# Altium PCB Node_Bus.PcbDoc
Units mm, origin at the board's own origin, x right, y up, seen from the top; angles counter-clockwise.
Board outline 90 x 90 mm, 2 copper layers (Top Layer, Bottom Layer); 58 components, 55 nets, 246 pads, 301 vias.
Unrouted connection lines stored in the file: 3.
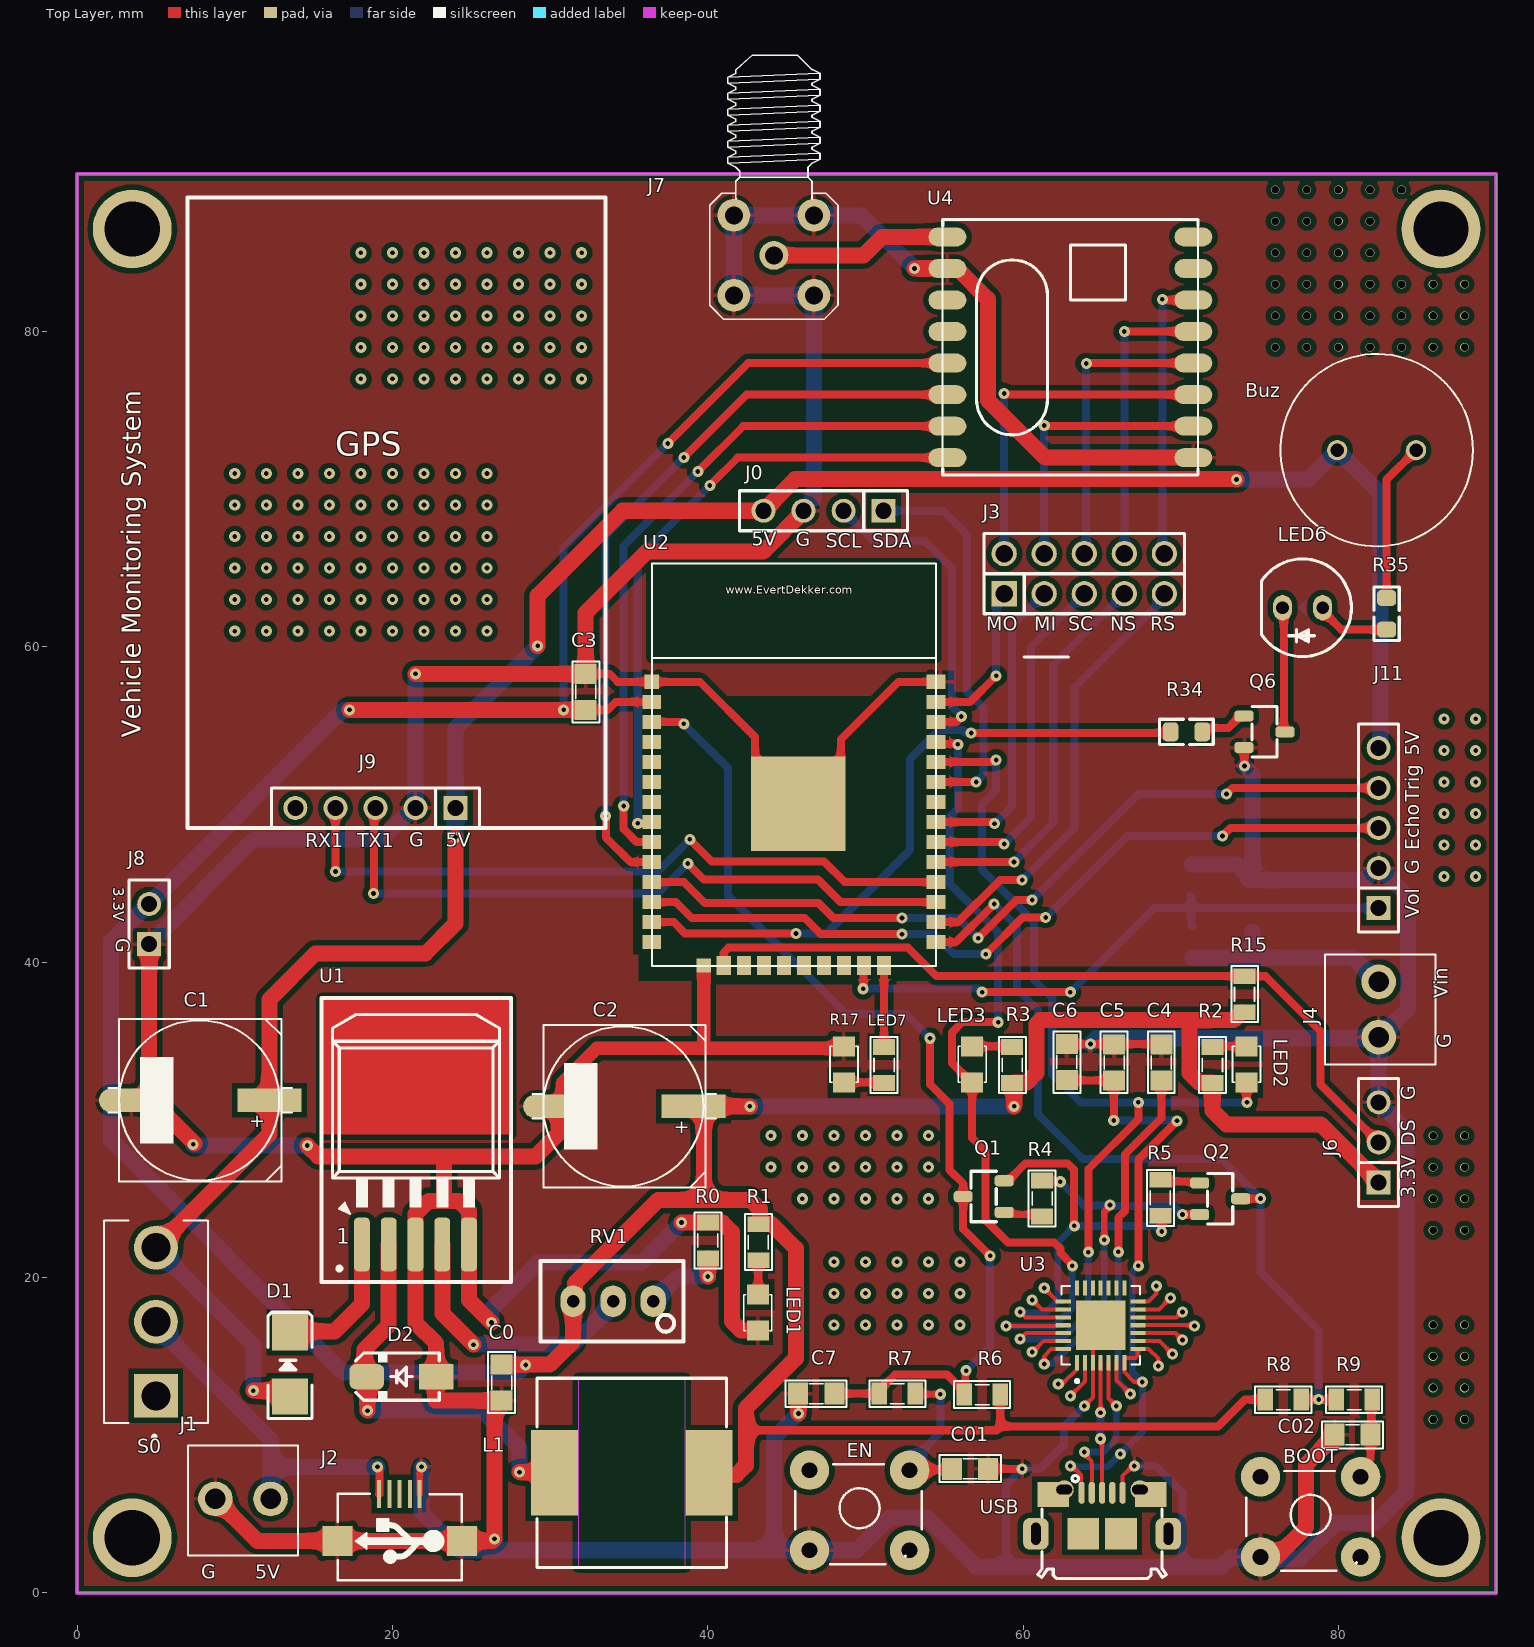
[diagram p0: Top Layer view]
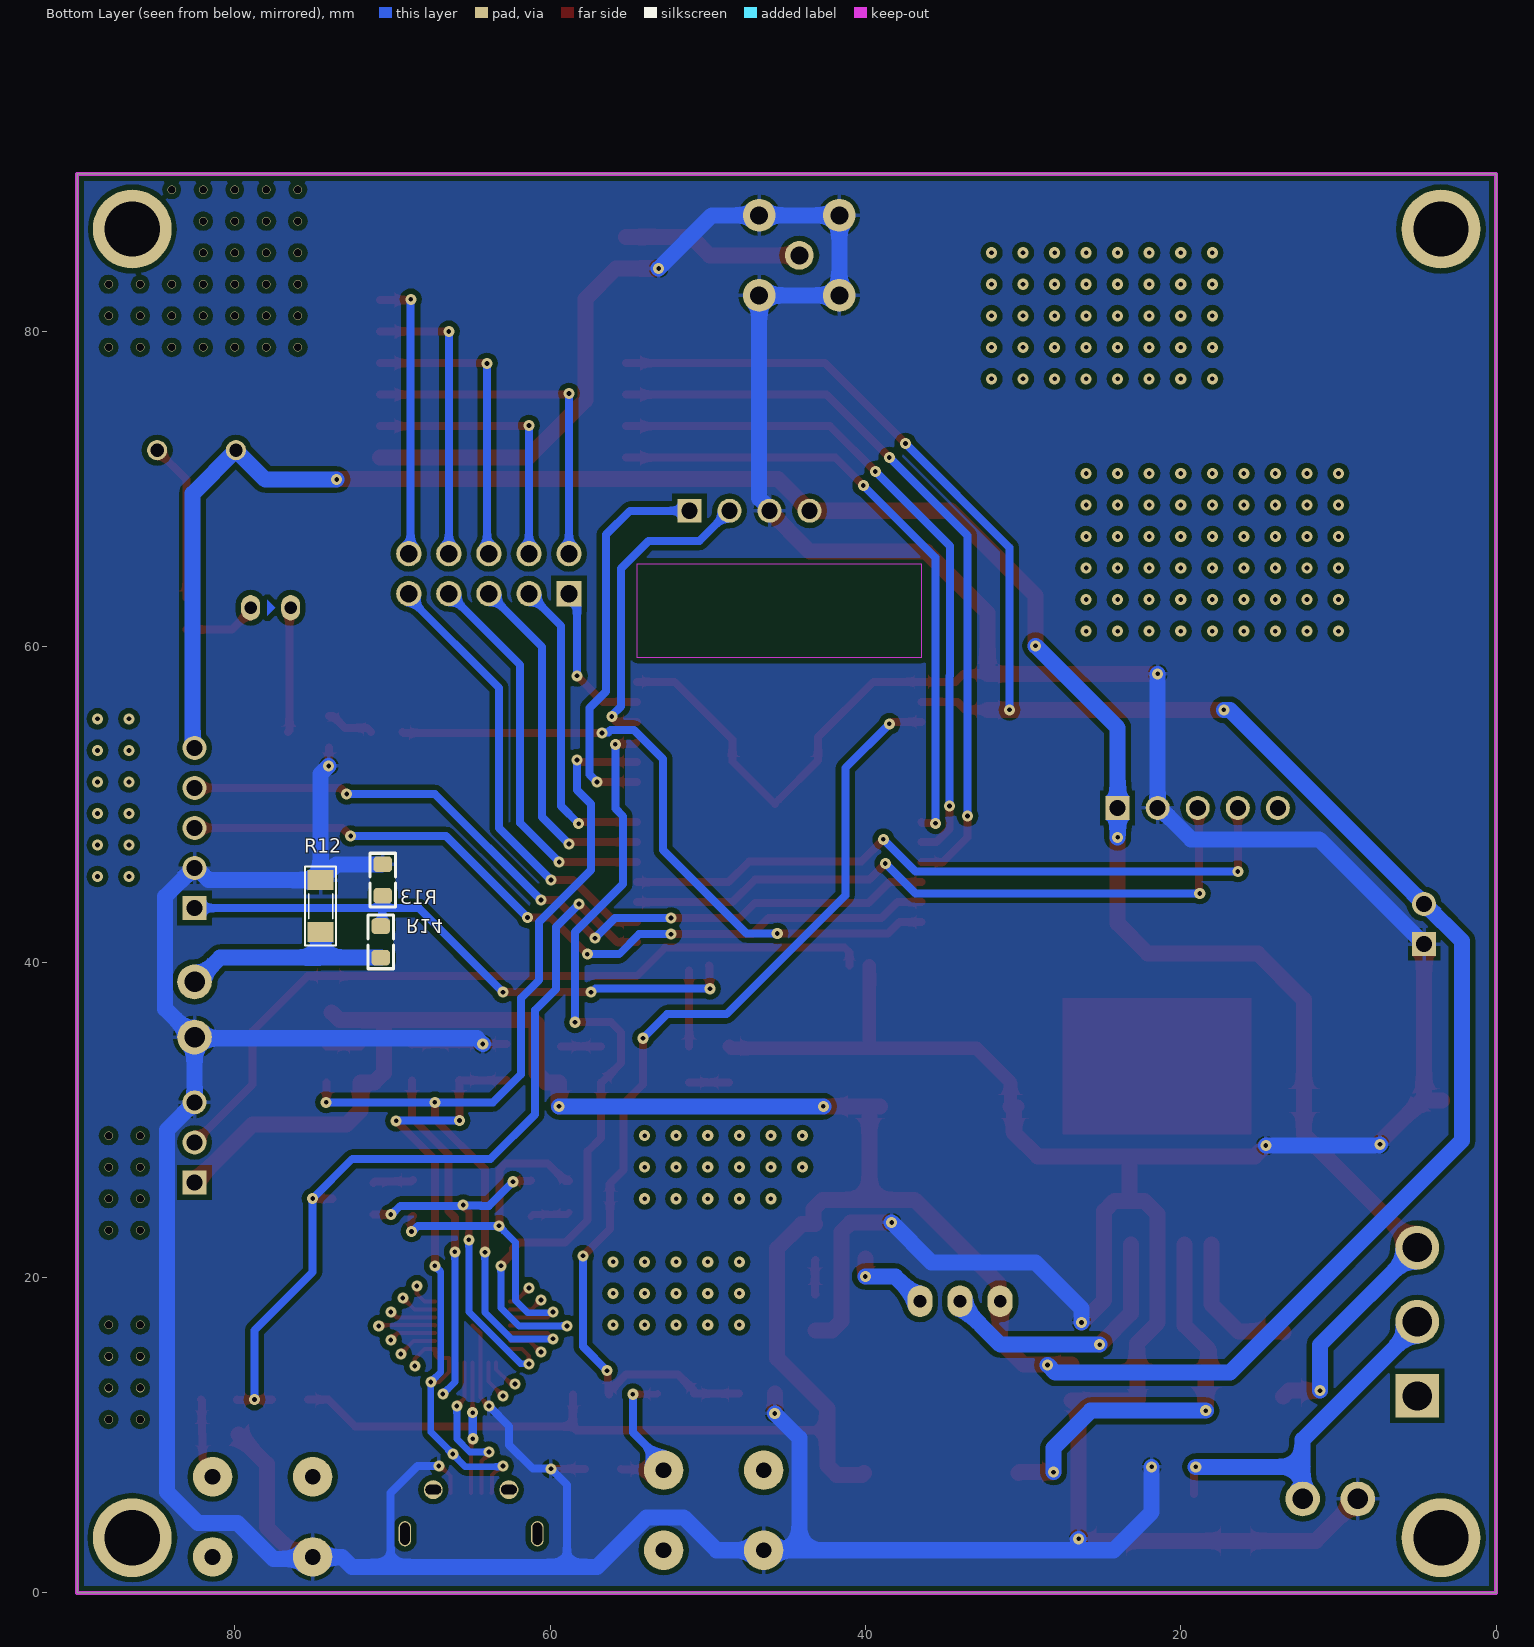
[diagram p1: Bottom Layer view, seen from below]

## Layer stack, top to bottom
Top Solder: solder mask 0.0102, Solder Resist, Dk 3.5
Top Layer: signal copper 0.0356
Dielectric 1: dielectric 0.32, FR-4, Dk 4.8
Bottom Layer: signal copper 0.0356
Bottom Solder: solder mask 0.0102, Solder Resist, Dk 3.5

## Board outline
0,0 90,0 90,90 0,90

## Design rules (kind name [scope] priority, off if disabled: settings)
Clearance [All] p1: gap=0.33 ignorepadtopadclearanceinfootprint=FALSE
HoleSize [All] p1: absolutevalues=TRUE maxlimit=3.5 minlimit=0.3 maxpercent=80.000 minpercent=20.000
PlaneClearance [All] p1: clearance=0.381
PolygonConnect [All] p1: connectstyle=Relief reliefconductorwidth=0.254 reliefentries=4 polygonreliefangle="90 Angle" airgapwidth=0.254
RoutingVias [All] p1: holewidth=0.3 width=0.7 viastyle="Through Hole" minholewidth=0.3 minwidth=0.7 maxholewidth=0.3 maxwidth=0.7
SilkToSolderMaskClearance [All] p1: minsilkscreentomaskgap=0.254 clearancetoexposedcopper=TRUE
SolderMaskExpansion [All] p1: expansion=0.102 istentingtop=FALSE
Width [InNetClass('NewClass')] p1: maxlimit=1.016 minlimit=0.432 preferedwidth=1.016
Width Width_1 [All] p2: maxlimit=1.016 minlimit=0.254 preferedwidth=0.508 minimp=50.000000 maximp=50.000000 favimp=50.000000
27 further rules are at their usual default settings.

## Components (designator, comment, footprint, x,y, rotation, side; value= is the part's Value field where it differs from the comment)
BOOT "Button 4pin" "Button 4pin" 78.105,5.08 r0 top
Buz "PS1240P02BT" XDCR_PS1240P02BT 82.423,72.477 r0 top
C0 "10uF" SM-0805 26.924,13.335 r270 top value=103
C01 "1nF" SM-0805 56.642,7.874 r180 top value=103
C1 "220uF" CAP-ALU-SMD-G 7.747,31.242 r180 top
C02 "1nF" SM-0805 80.899,10.033 r0 top value=103
C2 "220uF" CAP-ALU-SMD-G 34.645,30.861 r180 top
C3 "102" SM-0805 32.258,57.15 r90 top value=103
C4 "10uF" SM-0805 68.77,33.642 r270 top value=103
C5 "10uF" SM-0805 65.77,33.642 r270 top value=103
C6 "1uF" SM-0805 62.77,33.668 r90 top value=103
C7 "10uF" SM-0805 46.881,12.643 r0 top value=103
D1 "Diode SMD" DIO-SMD-106 13.5,14.5 r270 top value=1N5007
D2 "SS34" D_SMA 20.574,13.716 r180 top
EN "Button 4pin" "Button 4pin" 49.5,5.5 r0 top
J0 "JP4" JP4-C1T 51.159,68.635 r180 top
J1 "KF2" KF2-3.5 10.52,5.96 r0 top
J2 "USB-5" USB-M1 20.46,6.27 r180 top
J3 "JP5x2" JP5-D2T 63.881,64.643 r0 top
J4 "KF2" KF2-3.5 82.55,37.003 r90 top
J6 "JP3" JP3-C1T 82.55,26.035 r90 top
J7 "210111003" SMA-RA 44.196,84.836 r180 top
J8 "JP2" JP2-C1T 4.572,41.148 r90 top
J9 "JP5" JP5-C1T 24.003,49.784 r180 top
J11 "JP5" JP5-C1T 82.55,43.434 r90 top
L1 "33uH" L-SMD-M-12x10 35.179,7.62 r90 top
LED1 "LED" LED-0805-Red 43.18,18.923 r270 top value="LED 3 - 5 ly 2 Colour"
LED2 "LED" LED-0805-Red 74.168,34.671 r270 top value="LED 3 - 5 ly 2 Colour"
LED3 "LED" LED-0805-Red 56.77,34.671 r270 top value="LED 3 - 5 ly 2 Colour"
LED6 "LED5MM_RED" LED5MM_RED 77.724,62.484 r180 top
LED7 "LED" LED-0805-Red 48.641,32.385 r90 top value="LED 3 - 5 ly 2 Colour"
Q1 "SS8050" SOT23_3 57.5,25.141 r180 top
Q2 "SS8050" SOT23_3 72.5,25 r0 top
Q6 "SS8050" SOT23_3 75.311,54.61 r0 top
R0 "330" RES-SMD-0805 40.005,22.352 r90 top
R1 "1k" RES-SMD-0805 43.212,22.245 r90 top
R2 "Res" RES-SMD-0805 72.009,33.49 r90 top
R3 "Res" RES-SMD-0805 59.309,33.49 r90 top
R4 "10K" RES-SMD-0805 61.214,25.019 r270 top
R5 "10K" RES-SMD-0805 68.707,25.061 r90 top
R6 "10K" RES-SMD-0805 57.404,12.573 r180 top
R7 "1K" RES-SMD-0805 52.024,12.643 r0 top
R8 "10K" RES-SMD-0805 76.5,12.262 r0 top
R9 "1K" RES-SMD-0805 81,12.262 r0 top
R12 "0.1R" RES-SMD-1206 74.549,43.561 r90 bottom
R13 "100K" R0805 70.739,41.291 r270 bottom
R14 "10K" R0805 70.612,45.212 r90 bottom
R15 "4.7K" RES-SMD-0805 74.041,37.973 r90 top
R17 "1K" RES-SMD-0805 51.181,33.49 r270 top
R34 "3.9K" R0805 70.358,54.61 r180 top
R35 "10K" R0805 83.058,62.103 r270 top
RV1 "RV20K" RVAR10K 34,18.5 r180 top
S0 "500SSP1S2M2QEA" SW_500SSP1S2M2QEA 5,17.2 r90 top
U1 "LM2596" TO263 21.082,28.067 r0 top
U2 "ESP32S_Module" ESP32S 36.449,39.751 r0 top locked
U3 "CP2102" QFN50P500X500X100-29N 64.921,16.975 r90 top
U4 "SW96" RFM22_S 63,79 r180 top
USB "CONN_USB_MICROB" USB_MICRO_B_BM_SHS 65.009,6.35 r180 top

## Footprints (in the part's own frame and the unit in brackets; to place one, negate y for a bottom-side part, rotate by r counter-clockwise, add the part's x,y. Pads: shape width x height; smd on the part's side, far side on the other; paste and mask are expansions set on the pad)
"Button 4pin" [mm] "nut nhan 4pin"
  round 2.5 hole 1: 1(-3.048,2.286) 2(3.302,-2.794) 3(3.302,2.286) 4(-3.048,-2.794)
  silkscreen extent -3.95,-3.67 4.08,2.65, body extent -3.9,-3.63 4,2.57, height 7
CAP-ALU-SMD-G [mil]
  rect 160x59.06 smd: 1(-175,0)
  oval 160x59.06 smd: 2(170,0)
  silkscreen extent -231,-203 226,203, body extent -233,-203 223,203, height 402
D_SMA [mm] "SMA Molded Diode, 2-Leads, Body 4.3x2.7mm, SOD-128"
  rect 2.2x1.6 smd paste-0.1: 1(-2.2,0)
  rrect50% 2.2x1.6 smd paste-0.1: 2(2.2,0)
  silkscreen extent -2.4,-1.5 2.9,1.5, body extent -2.75,-1.4 2.75,1.4, height 2.6
DIO-SMD-106 [mil]
  rect 90x90.55 smd: 1(80,0) 2(-80,0)
  silkscreen extent -130,-55 135,55, body extent -99,-50 106,52, height 95
ESP32S [mm] "ESP32S-Module"
  rect 0.9x0.9 smd: 1(0,18.034) 15(3.3,0.034)
  rect 1.2x0.9 smd: 2(0,16.764) 3(0,15.494) 4(0,14.224) 5(0,12.954) 6(0,11.684) 7(0,10.414) 8(0,9.144) 9(0,7.874) 10(0,6.604) 11(0,5.334) 12(0,4.064) 13(0,2.794) 14(0,1.524) 25(18.034,1.524) 26(18.034,2.794) 27(18.034,4.064) 28(18.034,5.334) 29(18.034,6.604) 30(18.034,7.874) 31(18.034,9.144) 32(18.034,10.414) 33(18.034,11.684) 34(18.034,12.954) 35(18.034,14.224) 36(18.034,15.494) 37(18.034,16.764) 38(18.034,18.034)
  rect 0.9x1.2 smd: 16(4.57,0.034) 17(5.84,0.034) 18(7.11,0.034) 19(8.38,0.034) 20(9.65,0.034) 21(10.92,0.034) 22(12.19,0.034) 23(13.46,0.034) 24(14.73,0.034)
  rect 6x6 smd: 101(9.3,10.3)
  Keep-Out Layer region: 0,19.558 18.034,19.558 18.034,25.527 0,25.527
  silkscreen extent 0,0 18.03,25.53, body extent 0,0 18.03,25.53, height 2
JP2-C1T [mm] "2 row, straight, gold plating"
  rect 1.52x1.52 hole 1.02: 1(0,0)
  round 1.52 hole 1.02: 2(2.54,0)
  silkscreen extent -1.52,-1.27 4.06,1.27, body extent -1.52,-1.25 4.06,1.25, height 8.51
JP3-C1T [mm] "3 row, straight, gold plating"
  rect 1.52x1.52 hole 1.02: 1(0,0)
  round 1.52 hole 1.02: 2(2.54,0) 3(5.08,0)
  silkscreen extent -1.52,-1.27 6.6,1.27, body extent -1.52,-1.25 6.6,1.25, height 8.51
JP4-C1T [mm] "4 row, straight, gold plating"
  rect 1.52x1.52 hole 1.02: 1(0,0)
  round 1.52 hole 1.02: 2(2.54,0) 3(5.08,0) 4(7.62,0)
  silkscreen extent -1.52,-1.27 9.14,1.27, body extent -1.52,-1.25 9.14,1.25, height 8.51
JP5-C1T [mm] "5 row, straight, gold plating"
  rect 1.52x1.52 hole 1.02: 1(0,0)
  round 1.52 hole 1.02: 2(2.54,0) 3(5.08,0) 4(7.62,0) 5(10.16,0)
  silkscreen extent -1.52,-1.27 11.68,1.27, body extent -1.52,-1.25 11.68,1.25, height 8.51
JP5-D2T [mm] "10 pins, dual pin, straight, gold plating"
  rect 1.6x1.6 hole 1.1: 1(-5.08,-1.27)
  round 1.6 hole 1.1: 2(-2.54,-1.27) 3(0,-1.27) 4(2.54,-1.27) 5(5.08,-1.27) 6(5.08,1.27) 7(2.54,1.27) 8(0,1.27) 9(-2.54,1.27) 10(-5.08,1.27)
  silkscreen extent -6.35,-2.54 6.35,2.54, body extent -6.35,-2.54 6.35,2.54, height 8.55
KF2-3.5 [mm] "3,50mm - modular - blue - Horizontal wire entry - Pressure clamp - 8,4mm height - 02p"
  round 2.2 hole 1.3: 1(-1.75,0) 2(1.75,0)
  silkscreen extent -3.5,-3.6 3.5,3.4, body extent -3.95,-3.6 4.05,3.4, height 8.41
L-SMD-M-12x10 [mm] "WE-PDA SMD Shielded Power Inductor, 1210"
  rect 5.4x3 smd: 1(0,4.9) 2(0,-4.9)
  Top Layer keep-out region: -6,-3.4 6,-3.4 6,3.399 -6,3.399
  silkscreen extent -6,-6 6,6, body extent -6,-6 6,6, height 9.7
LED5MM_RED [mm] "LED THD 5MM RED"
  oval 1.2x1.6 hole 0.8: 1(-1.27,0) 2(1.27,0)
  Bottom Layer region: -0.2,0.5 -0.2,-0.5 0.3,0
  silkscreen extent -3.1,-3.1 2.6,3.1, body extent -3,-3 2.5,3, height 9.14
LED-0805-Red [mil]
  rect 50x55 smd: 1(0,0) 2(90,0)
  silkscreen extent 0,-35 90,35, body extent 5,-25 85,25, height 43
QFN50P500X500X100-29N [mm]
  rrect25% 0.97x0.26 smd: 1(-2.37,1.5) 2(-2.37,1) 3(-2.37,0.5) 4(-2.37,0) 5(-2.37,-0.5) 6(-2.37,-1) 7(-2.37,-1.5) 15(2.37,-1.5) 16(2.37,-1) 17(2.37,-0.5) 18(2.37,0) 19(2.37,0.5) 20(2.37,1) 21(2.37,1.5)
  rrect25% 0.26x0.97 smd: 8(-1.5,-2.37) 9(-1,-2.37) 10(-0.5,-2.37) 11(0,-2.37) 12(0.5,-2.37) 13(1,-2.37) 14(1.5,-2.37) 22(1.5,2.37) 23(1,2.37) 24(0.5,2.37) 25(0,2.37) 26(-0.5,2.37) 27(-1,2.37) 28(-1.5,2.37)
  rect 3.15x3.15 smd paste-3: 29(0,0)
  silkscreen extent -3.64,-2.5 2.5,2.5
R0805 [mm] "CHIP RESISTOR 1/8 WATT ,2.0X1.3mm, 0805, 2012"
  rrect50% 1x1.2 smd paste-5 mask+0.075: 1(-1,0) 2(1,0)
  Top Layer pour cut-out: -0.5,0.8 0.5,0.8 0.5,-0.8 -0.5,-0.8
  silkscreen extent -1.7,-0.8 1.7,0.8, body extent -1.15,-0.67 1.15,0.67, height 0.76
RES-SMD-0805 [mm]
  rect 1x1.397 smd: 1(-1.143,0) 2(1.143,0)
  silkscreen extent -1.78,-0.86 1.78,0.84, body extent -1,-0.62 1,0.63, height 0.8
RES-SMD-1206 [mil]
  rect 50x65 smd: 1(-65,0) 2(65,0)
  silkscreen extent -99,-38 99,39, body extent -63,-31 63,32, height 40
RFM22_S [mm] "MODULE, WIRELESS, RFM22-S1"
  oval 2.4x1.2 smd: 1(-7.8,7) 2(-7.8,5) 3(-7.8,3) 4(-7.8,1) 5(-7.8,-1) 6(-7.8,-3) 7(-7.8,-5) 8(-7.8,-7) 9(7.8,-7) 10(7.8,-5) 11(7.8,-3) 12(7.8,-1) 13(7.8,1) 14(7.8,3) 15(7.8,5) 16(7.8,7)
  silkscreen extent -8.1,-8.1 8.1,8.1, body extent -8,-8 8,7.9, height 6.18
RVAR10K [mm] "Bien tro vi chinh"
  oval 1.6x2 hole 0.8: 1(-2.54,0) 2(0,0) 3(2.54,0)
  silkscreen extent -4.47,-2.54 4.6,2.54, body extent -4.54,-2.4 4.66,2.4, height 12.02
SM-0805 [mil] "Compoment SMD 80x50mil"
  rect 50x55 smd: 1(-45,0) 2(45,0)
  silkscreen extent -77,-34 76,33, body extent -40,-27 40,23, height 24
SMA-RA [mil]
  round 72 hole 45: 1(0,0)
  round 82 hole 45: 2(-100,-100) 3(100,-100) 4(100,100) 5(-100,100)
  silkscreen extent -160,-500 160,160, body extent -137,-457 139,137, height 394
SOT23_3 [mm] "SOT-23, Micro3, MO-178, TO-236AB, MO-193C, SuperSOT3, SC-59, 1.5x3mm, Pitch 1.9mm"
  rrect50% 1.2x0.7 smd paste-0.05 mask+0.1: 1(-1.3,1) 2(-1.3,-1) 3(1.3,0)
  silkscreen extent -0.8,-1.6 0.8,1.6, body extent -1.32,-1.5 1.32,1.5, height 1.08
SW_500SSP1S2M2QEA [mm]
  rect 2.775x2.775 hole 1.85: 1(-4.7,0)
  round 2.775 hole 1.85: 2(0,0) 3(4.7,0)
  silkscreen extent -7.4,-3.3 6.43,3.3
TO263 [mm]
  rrect50% 1x3.4 smd: 1(-3.019,-5.969) 2(-1.319,-5.969) 4(2.081,-5.969) 5(3.781,-5.969)
  rrect50% 1x3.4 smd mask+0: 3(0.381,-5.969)
  Top Layer region: -5.568,1.016 6.432,1.016 6.432,9.65 -5.568,9.65
  silkscreen extent -5.57,-8.35 6.43,9.65, body extent -4.73,-6.84 5.43,7.8, height 4.57
USB-M1 [mil]
  rect 10x70 smd: 1(51.18,0) 2(25.59,0) 3(0,0) 4(-25.59,0) 5(-50,0)
  rect 74.8x74.8 smd: 5(-155.51,116.84) 5(155.51,116.84)
  silkscreen extent -155,-1 155,215, body extent -157,5 158,218, height 107
USB_MICRO_B_BM_SHS [mm] "CONN, USB Micro B - Standard (Bottom mount), Shell SMD, 473460001, ZX62-AB-5PA"
  oval 0.4x1.4 smd mask+0.05: 1(1.3,0) 2(0.65,0) 3(0,0) 4(-0.65,0) 5(-1.3,0)
  round 1.2 hole 0.6 slot 1 at 0 deg mask+0.05: SH1(-2.4,-0.2) SH2(2.4,-0.2)
  rect 2x2 smd: SH3(-1.2,2.6) SH4(1.2,2.6)
  rrect50% 1.6x2 / inner oval 0.8x1.6 / far side oval 0.8x1.6 hole 0.6 slot 1.4 at 90 deg: SH5(-4.2,2.6) SH6(4.2,2.6)
  rect 2x1.6 smd: SH7(-3.1,0.1) SH8(3.1,0.1)
  silkscreen extent -4.08,-1.1 4.08,5.43, body extent -3.99,-0.3 3.99,5.13, height 2.72
XDCR_PS1240P02BT [mm]
  round 1.28 hole 0.85: 1(-2.5,0) 2(2.5,0)
  silkscreen extent -6.1,-6.1 6.1,6.1

## Part data
Buz: "Buzzers Transducer, Externally Driven Piezo 3V 4kHz 60dB @ 3V, 10cm Through Hole PC Pins", Package="2020 TDK", Availability=Unavailable, MF=TDK, MP=PS1240P02BT, PRICE=None, SnapEDA_Link=https://www.snapeda.com/parts/PS1240P02BT/TDK/view-part/53420/?ref=snap
C0 C01 C02 C3 C4 C5 C6 C7: library part CM, "Cap SMD"
C1 C2: library part CN-ALU-SMD, "Polarized Capacitor (Axial)", LatestRevisionDate=17-Jul-2002, LatestRevisionNote="Re-released for DXP Platform.", PackageReference=POLAR0.8, Published=8-Jun-2000, Publisher="Altium Limited"
D1: "Default Diode", Code - JEDEC=DO-214-AB, Published=8-Jun-2000, Publisher="Altium Limited", Revision="July-2002: Re-released for DXP Platform."
D2: library part DIODE_SMD_SCHOTTKY_1N5822, "DIODE, SCHOTTKY, 40V, 3A", ASSEMBLY=ASSEMBLY, DESC=DESCRIPTION, MANF=DIODES, MANF_P#=1N5822, PARAM=40V, PARAM2=3A, PRICE=PRICE
J0: "WR-PHD 2.54 mm Angled Socket Header", Manufacturer="W¨¹rth Elektronik eiSos GmbH", partNo=613004143121, ComponentLink1 Description=Manufacturer, ComponentLink1URL=http://www.we-online.com, ComponentLink2 Description=Datasheet, ComponentLink2URL=http://katalog.we-online.de/em/datasheet/6130xx143121.pdf, Created by="Karrer Zheng", Created Date="29 March 2013", NoPins=04
J1 J4: Manufacturer="Würth Elektronik eiSos GmbH", partNo=691103110002, ComponentLink1 Description=Manufacturer, ComponentLink1URL=http://www.we-online.com, ComponentLink2 Description=Datasheet, ComponentLink2URL=http://katalog.we-online.de/em/datasheet/6911031100xx.pdf, Created by="Karrer Zheng", Created Date="29 October 2013", NoPins=2
J2: Manufacturer=FCI, Manufacturer Part Number=10118193-0001LF, Supplier Part Number 1=609-4616-1-ND, .Checked PCB=RF, .Checked SCH=MM, .Creator=MM, Category="Connectors, Interconnects", ComponentLink1Description=http://portal.fciconnect.com/Comergent//fci/drawing/10118193.pdf, ComponentLink1URL=http://portal.fciconnect.com/Comergent//fci/drawing/10118193.pdf, Connector Type="USB - micro B", Features="Shielded, Solder Retention", Gender=Receptacle, Ingress Protection=-, Mounting Type="Surface Mount, Right Angle, Horizontal", Number of Contacts=5, Packaging="Cut Tape (CT)", Pricing 1="1=0.46, 10=0.433, 25=0.3712, 50=0.3156, 100=0.3032, 250=0.27224, 500=0.25988 (USD)", RoHS="RoHS Compliant", Specifications="USB 2.0", Stock 1=28642, Supplier 1=Digi-Key
J3: "WR-PHD 2.54 mm Dual Socket Header", Manufacturer="W¨¹rth Elektronik eiSos GmbH", partNo=61301021821, ComponentLink1 Description=Manufacturer, ComponentLink1URL=http://www.we-online.com, ComponentLink2 Description=Datasheet, ComponentLink2URL=http://katalog.we-online.de/em/datasheet/6130xx21821.pdf, Created by="Karrer Zheng", Created Date="29 March 2013", NoPins=10
J6: "WR-PHD 2.54 mm Angled Socket Header", Manufacturer="W¨¹rth Elektronik eiSos GmbH", partNo=613003143121, ComponentLink1 Description=Manufacturer, ComponentLink1URL=http://www.we-online.com, ComponentLink2 Description=Datasheet, ComponentLink2URL=http://katalog.we-online.de/em/datasheet/6130xx143121.pdf, Created by="Karrer Zheng", Created Date="29 March 2013", NoPins=03
J7: library part "CON Ant", "CONNECTOR ANTEN", Manufacturer="Würth Elektronik eiSos GmbH", ComponentLink1Description=Manufacturer, ComponentLink1URL=http://www.we-online.de, ComponentLink2Description=Datasheet, ComponentLink2URL=http://katalog.we-online.de/kataloge/eisos/index.php?language=en&pf=Filter_gerade, Created by="Christin Zierenner", Created Date="May 2012", partNo=210111003
J8: "WR-PHD 2.54 mm Angled Socket Header", Manufacturer="W¨¹rth Elektronik eiSos GmbH", partNo=613002143121, ComponentLink1 Description=Manufacturer, ComponentLink1URL=http://www.we-online.com, ComponentLink2 Description=Datasheet, ComponentLink2URL=http://katalog.we-online.de/em/datasheet/6130xx143121.pdf, Created by="Karrer Zheng", Created Date="29 March 2013", NoPins=02
J9 J11: "WR-PHD 2.54 mm Angled Socket Header", Manufacturer="W¨¹rth Elektronik eiSos GmbH", partNo=613005143121, ComponentLink1 Description=Manufacturer, ComponentLink1URL=http://www.we-online.com, ComponentLink2 Description=Datasheet, ComponentLink2URL=http://katalog.we-online.de/em/datasheet/6130xx143121.pdf, Created by="Karrer Zheng", Created Date="29 March 2013", NoPins=05
L1: library part L-SMD-1, Inductance="1.0 μH", Manufacturer="Wurth Elektronik", partNo=78477010, ComponentLink1Description=Manufacturer, ComponentLink1URL=http://www.we-online.de, ComponentLink2Description=Datasheet, ComponentLink2URL=http://katalog.we-online.de/pbs/datasheet/78477010.pdf, Created by="Baojun Chen", Created Date=Nov.2015
LED1 LED2 LED3 LED7: library part "LED SMD"
LED6: library part LED_THD_5MM_RED, "LED, THD, 5MM, RED", ASSEMBLY=ASSEMBLY, DESC=DESCRIPTION, MANF=MANF, MANF_P#=MANF_PART#, PARAM2=2.2V, PRICE=PRICE
Q1 Q2 Q6: library part NPN_MMBT8050_SOT23, "BJT, NPN, 25v, 1.5A, SMD, SOT23", MANF=GALAXY, MANF_P#=MMBT8050, PARAM="25v, 1.5A", PARAM2=300mW, PRICE=0.09t@JAVAN
R0 R1 R2 R3 R4 R5 R6 R7 R8 R9 R15 R17: library part Res-SMD, "Resistor", Manufacturer="Generic Components", Class=Passive, Published=08/06/2000, Publisher="Altium Hobart Technology Centre"
R12 R13 R14 R34 R35: library part RES_SMD_0805, "RESISTOR, SMD", ASSEMBLY=ASSEMBLY, DESC=DESCRIPTION, DIST#=MOUSER, MANF=-, MANF_P#=-, PARAM=0.125W, PARAM2=1%, PRICE="100= 0.5$"
RV1: library part "Variable Resistor", "Variable Resistor", LatestRevisionDate=17-Jul-2002, LatestRevisionNote="Re-released for DXP Platform.", PackageReference=VR5, Published=8-Jun-2000, Publisher="Altium Limited", Set Position=0.5, Sim Note="Enter the Resistance value and the set point into parameter fields."
S0: "Slide Switch SPDT Through Hole", Package=None, Availability=Unavailable, MP=500SSP1S2M2QEA, PRICE=None
U1: Max Input Voltage="12 V", Max Output Current="3 (6.0 peak) A", Max Output Voltage=mV, Temperature Range="-40 to +125 degC", Category=IC-Power, Min Input Voltage=mV, Min Output Voltage=mV, Mounting Technology="Surface Mount", Status=Unreleased, Supply Voltage=mV
U2: "Esp-32S", Datasheet=https://espressif.com/sites/default/files/documentation/esp_wroom_32_datasheet_en.pdf
U3: "USB to USRT converter"
USB: library part CONN_USB_MICRO_B_BM_SHS, "CONN, USB, MICRO B, R/A, SMD, BOTTOM MOUNT", MANF=Molex, MANF_P#=47346-0001, MANF_P#2="HIROSE ZX62-AB-5PA", PARAM="1.8A, -20~85oC", PARAM2=30VAC, PRICE=0.75$

## Free pads (board coordinates)
  round 5 hole 3.5: 4(3.5,86.5) 4(3.5,3.5) 4(86.5,3.5) 4(86.5,86.5)

## Via types
v1: diameter 0.7, hole 0.3, Top Layer to Bottom Layer, 241 vias
v2: diameter 0.55, hole 0.48, Top Layer to Bottom Layer, 50 vias
v3: diameter 0.7, hole 0.3, Top Layer to Bottom Layer, tented top, 10 vias

## Nets (pads, with @x,y where several pads share a name; then routed paths per layer and width w, separated by ;. In a path a pad name is that pad's centre, name@x,y a point inside that pad or via, vN(x,y) a via of type N, cw(c..) or ccw(c..) an arc to the next point about the centre after c; other vN are vias at no path point)
+3.3V: C0.1 C2.1 C3.1 J6.1 J8.2 L1.2 R1.2 R2.1 R3.1 R6.1 R8.1 R15.1 RV1.3 U2.2 U4.13 | length 271.1
  Top Layer w0.508: C3.1 33.655,56.007 34.163,56.515 U2.2 ; v1(37.465,72.898) 42.567,78 U4.13 ; 42.418,10.317 58.31,10.317 58.547,10.555 ; R6.1 58.547,10.555 ; R8.1 74.069,12.262 72.362,10.555 65.229,10.555 65.221,10.562 64.573,10.562 64.565,10.555 58.547,10.555
  Top Layer w1.016: v1(17.272,56.007) v1(30.861,56.007) C3.1 ; C0.1 v1@28.469,14.478 ; v1(28.448,14.457) v1@28.469,14.478 ; C2.1 v1(42.672,30.861) ; C2.1@39.636,30.861 39.751,30.746 39.751,24.935 ; L1.2 40.206,7.493 41.823,7.493 42.418,8.088 42.418,10.317 42.418,11.702 45.593,14.877 45.593,21.844 44.049,23.388 R1.2@43.299,23.388 ; R1.2 R1.2@43.299,23.388 ; v1(59.436,30.861) 59.436,32.377 59.444,32.385 60.25,32.385 60.846,32.98 60.846,36.081 61.087,36.322 70.739,36.322 ; R15.1@73.851,36.822 73.351,36.322 70.739,36.322 ; J6.1 78.867,29.718 72.898,29.718 72.009,30.607 72.009,32.385 71.144,32.385 70.549,32.98 70.549,36.132 70.739,36.322 ; v1@28.469,14.478 29.972,14.478 31.46,15.966 RV1.3 31.572,18.612 31.572,19.634 36.873,24.935 39.751,24.935 ; 39.751,24.935 42.712,24.935 43.307,24.34 43.307,23.396 R1.2@43.299,23.388
  Bottom Layer w0.508: v1(30.861,56.007) 30.861,66.294 v1(37.465,72.898)
  Bottom Layer w1.016: v1(17.272,56.007) 16.891,56.007 J8.2 4.514,43.688 2.159,41.333 2.159,28.702 16.891,13.97 27.961,13.97 v1(28.448,14.457) ; v1(42.672,30.861) v1(59.436,30.861)
+5V: Buz.1 C1.1 D1.1 J0.4 J9.1 J11.5 S0.3 | length 144
  Top Layer w1.016: S0.3 12.192,29.092 C1.1 12.192,37.634 15.113,40.555 22.098,40.555 24.003,42.46 v1(24.003,47.921) ; v1(11.176,12.827) 13.141,12.827 D1.1 ; v1(29.21,60.071) 29.21,63.246 34.599,68.635 J0.4 ; J0.4@43.704,68.8 45.542,70.638 73.507,70.638 v1(73.533,70.612)
  Bottom Layer w1.016: S0.3 11.176,15.724 v1(11.176,12.827) ; v1(24.003,47.921) J9.1 24.003,54.864 v1(29.21,60.071) ; v1(73.533,70.612) 78.058,70.612 Buz.1 82.677,69.723 82.677,54.077 82.646,54.047 82.646,53.69 J11.5
alarm: R34.2 U2.13 | length 42
  Top Layer w0.508: U2.13 37.846,42.545 38.566,41.825 v3(45.593,41.825) ; v1(56.71,54.546) 56.718,54.555 69.303,54.555 R34.2
  Bottom Layer w0.508: v3(45.593,41.825) 47.54,41.825 52.832,47.117 52.832,52.895 54.675,54.738 55.344,54.738 55.349,54.733 56.16,54.733 56.31,54.583 56.673,54.583 v1(56.71,54.546)
BOOT: Q2.3 R8.2 R9.1 U2.25 | length 54.4
  Top Layer w0.508: U2.25 55.753,41.275 v1(58.166,43.688) ; Q2.3 75.027,25 75.046,25.019 v1(75.057,25.019) ; v1(78.75,12.262) R8.2 77.654,12.251 78.742,12.251 78.75,12.243 78.758,12.251 79.846,12.251 R9.1
  Bottom Layer w0.508: v1(58.166,43.688) 59.627,42.228 59.627,38.291 60.96,36.957 60.96,30.353 63.782,27.531 72.545,27.531 v1(75.057,25.019) 75.057,20.35 78.75,16.657 v1(78.75,12.262)
D+: U3.4 USB.3 | length 8.3
  Top Layer w0.254: v1(64.897,9.779) 64.897,9.699 65.009,9.587 USB.3 ; v1@64.918,11.438 64.918,14.602 U3.4
  Bottom Layer w0.508: v1(64.897,9.779) 64.905,9.787 64.905,11.425 v1(64.913,11.433)
D-: U3.5 USB.2 | length 10.2
  Top Layer w0.254: v1(63.881,8.932) 63.881,8.816 64.34,8.357 64.34,8.177 64.359,8.158 USB.2 ; 65.421,12.34 U3.5 ; 65.426,12.34 v1(65.913,11.853)
  Bottom Layer w0.432: v1(63.881,8.932) 63.889,8.94 65.095,8.94 65.913,9.758 v1(65.913,11.853)
DIO0: U2.10 U4.14 | length 48.1
  Top Layer w0.508: v1(33.528,49.276) 33.536,49.268 33.536,47.913 35.094,46.355 U2.10 ; v1(38.481,72.009) 42.472,76 U4.14
  Bottom Layer w0.508: v1(33.528,49.276) 33.528,67.056 v1(38.481,72.009)
DIO1: U2.9 U4.15 | length 43.8
  Top Layer w0.508: v1(34.671,49.911) 34.671,48.444 35.49,47.625 U2.9 ; v1(39.37,71.12) 42.25,74 U4.15
  Bottom Layer w0.508: v1(34.671,49.911) 34.671,58.142 34.641,58.172 34.641,66.391 v1(39.37,71.12)
DIO2: U2.8 U4.16 | length 40
  Top Layer w0.508: v1(35.56,48.81) 35.597,48.847 36.401,48.847 U2.8 ; v1(40.132,70.231) 41.901,72 U4.16
  Bottom Layer w0.508: v1(35.56,48.81) 35.56,65.659 v1(40.132,70.231)
ds12b8: J6.2 R15.2 U2.16 | length 49.6
  Top Layer w0.508: U2.16 41.019,40.627 41.317,40.925 52.7,40.925 54.509,39.116 R15.2 75.383,39.116 78.869,35.629 78.869,32.256 J6.2
DTR: Q2.2 R4.1 U3.28 | length 24.9
  Top Layer w0.254: v1(61.341,14.52) 61.35,14.529 61.35,15.037 61.785,15.472 62.548,15.472 U3.28
  Top Layer w0.432: v1(65.151,22.394) 65.151,24.176 65.509,24.534 v1(65.509,24.607)
  Top Layer w0.508: R4.1 61.262,26.114 62.32,26.114 v1(62.357,26.077) ; v1(70.104,24.003) 70.105,24.002 Q2.2 Q2.2
  Bottom Layer w0.432: v1(61.341,14.52) 61.361,14.54 61.869,14.54 65.151,17.822 v1(65.151,22.394) v1@65.1,22.445
  Bottom Layer w0.508: v1(62.357,26.077) 63.881,24.553 64.389,24.553 64.406,24.57 65.473,24.57 v1(65.509,24.607) ; v1@65.563,24.553 69.502,24.553 70.052,24.003 v1(70.104,24.003)
Echo: J11.3 U2.12 | length 50.8
  Top Layer w0.508: U2.12 37.973,43.815 38.989,42.799 46.147,42.799 47.163,41.783 v3(52.324,41.783) ; v1@57.629,40.505 v1(57.637,40.513) 59.96,42.836 v1(61.433,42.836) ; v1(72.644,48.006) 72.655,48.006 73.163,48.514 J11.3
  Bottom Layer w0.508: v3(52.324,41.783) 54.345,41.783 55.615,40.513 v1(57.637,40.513) ; v1(61.433,42.836) 66.603,48.006 v1(72.644,48.006)
EN: C7.2 Q1.3 R6.2 R7.1 U2.3 | length 65.1
  Top Layer w0.432: R6.2 56.337,12.649 56.337,14.046 v1(56.388,14.097)
  Top Layer w0.508: U2.3 38.302,55.245 38.429,55.118 v1(38.481,55.118) ; C7.2 R7.1 50.881,12.842 51.889,13.85 55.183,13.85 56.261,12.772 R6.2 ; v1(54.102,35.179) 54.102,32.258 55.342,31.018 55.342,26.827 56.2,25.969 56.2,23.09 v1(57.912,21.378)
  Bottom Layer w0.508: v1(38.481,55.118) 41.275,52.324 41.275,44.238 48.81,36.703 52.578,36.703 v1(54.102,35.179) ; v1(56.388,14.097) 57.912,15.621 v1(57.912,21.378)
GND: BOOT.4 C0.2 C01.1 C1.2 C02.1 C2.2 C3.2 C4.1 C5.1 C6.2 C7.1 D2.1 EN.4 J0.3 J1.1 J2.5 J4.1 J6.3 J7.2 J7.3 J7.4 J7.5 J8.1 J9.2 J11.2 LED1.2 LED7.2 Q6.2 R0.2 R12.2 R14.2 U1.3 U1.5 U2.1 U2.15 U2.38 U2.101 U3.3 U3.29 U4.1 U4.10 USB.5 | length 526.3
  Top Layer w0.254: v1(63.881,11.853) 64.421,12.393 U3.3 64.421,16.475 U3.29 ; USB.5 66.309,7.431 66.489,7.611 66.503,7.611 66.935,8.043 v1(67.056,8.043)
  Top Layer w0.432: J2.5@21.73,6.27 21.73,7.855 21.844,7.969 v1(21.844,8.001)
  Top Layer w0.508: C3.2 33.782,58.293 34.29,57.785 U2.1 39.495,57.785 43.003,54.277 43.003,52.797 U2.101@45.466,50.334 ; 40.255,34.671 LED7.2 ; U2.101 48.441,52.743 48.441,54.121 52.105,57.785 U2.38 ; C01.1 v1(59.944,7.874) ; C6.2 v1(64.27,34.811) C5.1@65.745,34.811 ; C5.1 C5.1@65.745,34.811 ; C4.1 68.745,34.811 C5.1@65.745,34.811 ; Q6.2 74.033,53.588 74.033,52.459 v1(74.041,52.451)
  Top Layer w0.85: C2.2 30.496,30.861 30.796,31.161 30.796,32.388 32.952,34.544 39.624,34.544 ; U2.15 39.749,34.669 39.624,34.544 ; LED7.2 48.514,34.544 39.624,34.544
  Top Layer w1.016: C1.2 C1.2@4.348,31.242 ; J8.1 4.572,31.466 C1.2@4.348,31.242 ; v1@7.435,28.517 4.711,31.242 C1.2@4.348,31.242 ; J1.1 11.428,3.302 24.41,3.302 26.35,3.302 v1(26.477,3.429) 26.477,11.809 26.733,12.065 C0.2@26.733,12.192 ; v1(14.605,28.375) 15.294,27.686 23.241,27.686 ; v1(21.463,58.293) C3.2 32.258,62.165 36.133,66.04 43.519,66.04 J0.3@46.228,68.749 ; v1(26.289,17.145) 24.863,18.571 U1.5 24.863,24.218 24.214,24.867 23.262,24.867 ; C0.2 22.733,12.192 22.733,13.675 D2.1 22.774,15.834 21.463,17.145 U1.3 21.463,24.021 22.309,24.867 23.262,24.867 ; C2.2@30.803,30.861 30.579,30.637 30.579,29.182 29.083,27.686 23.241,27.686 ; v1(38.337,23.495) R0.2 40.013,23.487 40.934,23.487 41.529,22.892 41.529,17.232 42.124,16.637 LED1.2 ; C7.1 45.75,12.631 v1(45.75,11.38) ; v1(53.114,84) U4.10 55.827,84 57.764,82.063 57.764,75.643 61.407,72 U4.1 ; BOOT.4 75.184,2.159 75.946,2.159 77.958,4.171 77.958,8.172 79.629,9.842 79.629,9.906 C02.1 ; 23.241,27.686 23.262,27.665 23.262,24.867
  Bottom Layer w0.508: 58.928,1.651 58.928,6.858 59.952,7.882 61.095,7.882 62.597,9.384 62.597,10.569 v1(63.881,11.853) ; v1(67.056,8.043) 68.411,8.043 70.117,6.337 70.117,1.651
  Bottom Layer w1.016: J8.1 11.218,47.794 19.337,47.794 21.327,49.784 J9.2 v1(21.463,58.293) ; v1(7.366,28.448) 7.439,28.375 v1(14.605,28.375) ; v1(21.844,8.001) 21.844,5.122 24.26,2.706 26.455,2.706 ; v1(26.289,17.145) 26.289,18.034 29.21,20.955 35.797,20.955 v1(38.337,23.495) ; v1(26.477,3.429) 26.543,3.363 26.543,2.794 ; 26.631,2.706 44.196,2.706 ; v1(45.75,11.38) 44.196,9.826 44.196,2.706 ; J0.3 46.079,68.771 46.736,69.428 J7.5 J7.4 J7.3 J7.2 49.738,87.376 v1(53.114,84) ; v1(64.27,34.811) 64.638,35.179 82.476,35.179 J4.1 ; R14.2@70.704,46.204 73.557,46.204 74.232,45.529 74.232,45.339 74.359,45.212 R12.2 ; v1(74.041,52.451) 74.549,51.943 R12.2@74.549,45.466 ; R12.2@74.867,45.212 81.651,45.212 82.414,45.974 82.608,45.974 84.412,44.17 84.412,37.041 82.624,35.253 J4.1 ; 44.196,2.706 EN.4 49.442,2.706 51.53,4.794 53.88,4.794 57.023,1.651 58.928,1.651 70.117,1.651 72.577,1.651 73.189,2.263 75.034,2.263 BOOT.4 75.184,2.159 77.555,2.159 79.82,4.424 82.327,4.424 84.308,6.406 84.308,29.357 J6.3 J4.1
led: R17.1 U2.24 | length 4.8
  Top Layer w0.508: U2.24@51.179,39.47 51.179,34.673 R17.1@51.181,34.671
MI: J3.2 U2.31 | length 19.6
  Top Layer w0.508: U2.31 58.07,48.895 58.176,48.789 v1(58.187,48.789)
  Bottom Layer w0.508: v1(58.187,48.789) 59.309,49.911 59.309,61.341 J3.2
MISO: J3.9 U4.2 | length 17.6
  Top Layer w0.508: v3(61.341,74.041) 61.352,74.041 61.393,74 U4.2
  Bottom Layer w0.508: J3.9 v3(61.341,74.041)
Mo: J3.1 U2.37 | length 10.1
  Top Layer w0.508: U2.37 56.642,56.515 v1(58.293,58.166) ; J3.1 J3.1@58.928,63.246
  Bottom Layer w0.508: v1(58.293,58.166) 58.293,62.865 J3.1
MOSI: J3.10 U4.3 | length 22.2
  Top Layer w0.508: v3(58.801,76.073) 58.812,76.073 58.885,76 U4.3
  Bottom Layer w0.508: J3.10 v3(58.801,76.073)
NetBOOT_3: BOOT.3 C02.2 R9.2 | length 5.2
  Top Layer w0.508: BOOT.3 81.407,7.905 82.042,8.54 C02.2 82.092,10.083 82.092,12.212 R9.2
NetBuz_2: Buz.2 R35.1 | length 10.1
  Top Layer w0.508: R35.1 83.058,70.612 Buz.2
NetC01_2: C01.2 EN.3 R7.2 | length 10
  Top Layer w0.432: R7.2 53.21,12.6 v1(54.75,12.6)
  Top Layer w0.508: EN.3 52.846,7.83 55.455,7.83 C01.2
  Bottom Layer w0.508: EN.3 52.802,8.236 54.75,10.184 v1(54.75,12.6)
NetC4_2: C4.2 U3.6 | length 23.7
  Top Layer w0.254: U3.6@65.929,14.605 65.929,13.488 v1(66.802,12.615)
  Top Layer w0.508: v1(66.04,21.632) 66.04,23.817 66.456,24.232 66.456,27.821 68.77,30.135 C4.2
  Bottom Layer w0.432: v1(66.04,21.632) 66.04,13.377 v1(66.802,12.615)
NetD1_2: D1.2 U1.1 | length 9.1
  Top Layer w1.016: D1.2 13.563,16.595 16.341,16.595 18.063,18.317 U1.1
NetD2_2: D2.2 L1.1 U1.2 | length 25.6
  Top Layer w1.016: v1(18.415,11.557) 18.415,13.675 18.239,13.851 18.239,15.445 19.763,16.969 U1.2 ; v1(28.067,7.662) 30.237,7.662 L1.1
  Bottom Layer w1.016: v1(18.415,11.557) 25.713,11.557 28.067,9.203 v1(28.067,7.662)
NetJ1_2: J1.2 J2.1 S0.2 | length 22.8
  Top Layer w0.508: v1(19.05,8.001) 19.05,7.99 19.169,7.871 19.169,6.279 J2.1
  Bottom Layer w1.016: S0.2 5,16.99 12.27,9.72 12.27,8.001 ; J1.2 12.27,8.001 ; v1(19.05,8.001) 12.27,8.001
NetJ4_2: J4.2 R12.1 R13.2 | length 14.1
  Bottom Layer w1.016: R13.2 72.74,40.291 74.549,40.291 ; R12.1 74.549,40.291 ; J4.2 82.476,38.753 80.935,40.295 80.931,40.291 74.549,40.291
NetJ7_1: J7.1 U4.9 | length 11.5
  Top Layer w1.016: J7.1 49.89,84.836 51.054,86 U4.9
NetLED1_1: LED1.1 R1.1 | length 2.2
  Top Layer w0.508: LED1.1 43.196,18.939 43.196,21.086 R1.1@43.18,21.102
NetLED2_1: LED2.1 R2.2 | length 2.2
  Top Layer w0.508: R2.2@72.009,34.671 LED2.1
NetLED3_1: LED3.1 R3.2 | length 2.5
  Top Layer w0.508: LED3.1 R3.2@59.309,34.671
NetLED6_1: LED6.1 R35.2 | length 4.8
  Top Layer w0.508: LED6.1 78.994,62.284 80.175,61.103 R35.2
NetLED6_2: LED6.2 Q6.3 | length 7.9
  Top Layer w0.508: LED6.2 76.532,62.406 76.532,54.689 Q6.3
NetLED7_1: LED7.1 R17.2 | length 2.5
  Top Layer w0.508: LED7.1 R17.2@51.181,32.385
NetQ1_1: Q1.1 R4.2 | length 2.5
  Top Layer w0.432: Q1.1 58.933,24.009 61.081,24.009 R4.2
NetQ2_1: Q2.1 R5.2 | length 2.6
  Top Layer w0.508: R5.2 68.815,26.096 71.104,26.096 Q2.1
NetQ6_1: Q6.1 R34.1 | length 3.1
  Top Layer w0.508: R34.1 71.358,54.618 71.604,54.864 73.015,54.864 73.761,55.61 Q6.1
NetR0_1: R0.1 RV1.1 | length 5.3
  Top Layer w1.016: v1(40.005,20.066) R0.1
  Bottom Layer w1.016: RV1.1 36.54,18.542 36.81,18.812 36.852,18.812 38.106,20.066 v1(40.005,20.066)
NetRV1_2: RV1.2 U1.4 | length 17.3
  Top Layer w1.016: U1.4 23.163,17.731 v1(25.146,15.748)
  Bottom Layer w1.016: v1(25.146,15.748) 28.194,15.748 31.448,15.748 34,18.3 RV1.2
NS: J3.4 U2.29 | length 24.9
  Top Layer w0.508: U2.29 v1(59.425,46.355)
  Bottom Layer w0.508: v1(59.425,46.355) 61.912,48.843 61.912,58.865 J3.4
NSS: J3.7 U4.5 | length 18.5
  Top Layer w0.508: v3(66.421,80.01) 66.426,80.005 70.795,80.005 U4.5
  Bottom Layer w0.508: J3.7 v3(66.421,80.01)
RESET: J3.6 U4.6 | length 18.2
  Top Layer w0.508: v3(68.834,82.042) 68.845,82.042 68.887,82 U4.6
  Bottom Layer w0.508: v3(68.834,82.042) 68.842,82.034 68.842,66.032 J3.6
RS: J3.5 U2.26 | length 28.5
  Top Layer w0.508: U2.26 55.88,42.545 58.547,45.212 v1(59.944,45.212)
  Bottom Layer w0.508: v1(59.944,45.212) 63.246,48.514 63.246,57.404 68.961,63.119 J3.5
RTS: Q1.2 R5.1 U3.24 | length 26.1
  Top Layer w0.254: v1(59.817,17.822) 60.164,17.475 U3.24
  Top Layer w0.508: Q1.2 59.05,26.142 60.155,27.246 62.821,27.246 63.215,26.852 63.215,23.314 v1(63.246,23.283) ; R5.1 68.779,23.846 68.779,22.929 v1(68.787,22.921)
  Bottom Layer w0.432: v1(59.817,17.822) 59.868,17.771 60.233,17.771 60.239,17.764 61.41,17.764 62.199,18.553 62.199,22.236 v1(63.246,23.283)
  Bottom Layer w0.508: v1(63.246,23.283) 68.373,23.283 68.735,22.921 v1(68.787,22.921)
RX1: J9.4 U2.28 | length 44.1
  Top Layer w0.508: v1(16.383,45.762) J9.4 ; v3(38.862,47.794) 40.259,46.397 47.371,46.397 48.683,45.085 U2.28
  Bottom Layer w0.508: v1(16.383,45.762) 36.83,45.762 v3(38.862,47.794)
RXD: LED3.2 U2.35 U3.25 | length 54.3
  Top Layer w0.254: v1@58.931,16.936 62.096,16.936 62.132,16.972 62.548,16.972 U3.25
  Top Layer w0.508: U2.35@54.541,53.917 54.601,53.857 55.823,53.857 v1(55.86,53.82) ; LED3.2 56.77,28.861 57.616,28.015 57.616,23.652 59.043,22.225 61.976,22.225 62.364,21.837 62.364,21.55 v1@63.119,20.795 ; LED3.2 56.707,32.386 55.488,33.605 55.488,35.549 56.134,36.195 v1(58.42,36.195)
  Bottom Layer w0.432: v1(58.928,16.933) 61.976,16.933 63.119,18.076 v1(63.119,20.743)
  Bottom Layer w0.508: v1(55.86,53.82) 55.86,49.747 55.372,49.259 55.372,44.958 58.42,41.91 v1(58.42,36.195)
SC: J3.3 U2.30 | length 22.3
  Top Layer w0.508: U2.30 58.663,47.625 58.79,47.498 v1(58.801,47.498)
  Bottom Layer w0.508: v1(58.801,47.498) 60.515,49.212 60.515,60.008 J3.3
SCK: J3.8 U4.4 | length 18.9
  Top Layer w0.508: v3(64.008,77.978) 64.019,77.978 64.041,78 U4.4
  Bottom Layer w0.508: J3.8 64,66.032 64,77.97 v3(64.008,77.978)
SDA: J0.1 U2.33 | length 24.8
  Top Layer w0.508: U2.33 v1(57.023,51.435)
  Bottom Layer w0.508: J0.1 54.936,68.635 56.451,67.12 56.451,57.175 57.493,56.134 57.493,51.905 v1(57.023,51.435)
SDL: J0.2 U2.36 | length 20.5
  Top Layer w0.508: U2.36 55.786,55.245 56.084,55.542 v1(56.084,55.591)
  Bottom Layer w0.508: J0.2 50.537,66.717 53.762,66.717 55.499,64.98 55.499,56.228 56.084,55.643 v1(56.084,55.591) ; 57.023,51.435 57.023,51.446 57.493,51.916
Trig: J11.4 U2.11 | length 51.5
  Top Layer w0.508: U2.11 38.481,45.085 39.81,43.756 47.016,43.756 47.973,42.799 v3(52.324,42.799) ; v1(57.15,41.529) 59.555,43.934 60.571,43.934 v1(60.579,43.942) ; v1(72.898,50.673) 72.909,50.673 73.29,51.054 J11.4
  Bottom Layer w0.508: v3(52.324,42.799) 55.88,42.799 v1(57.15,41.529) ; v1(60.579,43.942) 67.31,50.673 v1(72.898,50.673)
TX1: J9.3 U2.27 | length 43
  Top Layer w0.508: v1(18.796,44.365) 18.833,44.402 18.833,49.694 J9.3 ; v3(38.735,46.27) 39.751,45.254 46.99,45.254 48.429,43.815 U2.27
  Bottom Layer w0.508: v1(18.796,44.365) 36.83,44.365 v3(38.735,46.27)
TXD: LED2.2 U2.34 U3.26 | length 63.1
  Top Layer w0.254: v1@59.938,16.113 v1(59.817,16.113) 60.179,16.475 U3.26
  Top Layer w0.508: U2.34 58.155,52.705 58.282,52.832 v1(58.293,52.832) ; v1(64.135,21.609) 64.135,26.872 67.31,30.047 v1(67.31,31.115) ; LED2.2 74.168,31.159 74.201,31.126 v1(74.201,31.114)
  Bottom Layer w0.432: v1(59.817,16.113) 59.828,16.102 62.461,16.102 64.135,17.776 v1(64.135,21.609)
  Bottom Layer w0.508: v1(58.293,52.832) 58.293,50.927 57.404,50.038 57.404,45.847 60.706,42.545 60.706,38.862 61.849,37.719 61.849,32.893 63.627,31.115 v1(67.31,31.115) v1(74.201,31.114)
VBUS: C5.2 C6.1 U3.7 U3.8 USB.1 | length 44
  Top Layer w0.254: v1(62.992,8.043) 63.113,8.043 63.495,7.661 63.501,7.661 63.681,7.481 63.681,6.378 USB.1 ; v1(67.564,13.377) 67.555,13.386 67.047,13.386 66.424,14.009 66.424,14.602 U3.7 66.421,14.898 66.424,14.901 67.119,14.901 67.268,15.05 67.268,15.472 67.271,15.475 U3.8 67.964,15.475 68.58,14.859 v1(68.58,14.393)
  Top Layer w0.432: C5.2@65.745,32.525 C5.2
  Top Layer w0.508: C6.1 62.783,32.513 65.732,32.513 C5.2@65.745,32.525 ; v1(65.75,29.96) 65.76,29.97 65.76,32.49 C5.2 ; v1@67.294,20.759 67.31,20.776 67.31,27.49 v1(69.76,29.94)
  Bottom Layer w0.432: v1(62.992,8.043) 63.034,8.001 65.363,8.001 67.564,10.202 v1(67.564,13.377) 66.929,14.012 66.929,20.356 67.31,20.737 v1(67.31,20.743)
  Bottom Layer w0.508: v1(65.75,29.96) 65.76,29.95 69.75,29.95 v1(69.76,29.94)
  other v1: 66.167,8.805
voltage: J11.1 R13.1 R14.1 U2.23 | length 38.3
  Top Layer w0.508: v1(49.86,38.32) 49.885,38.345 49.885,39.76 U2.23 ; v1(57.404,38.1) v1(62.992,38.1)
  Bottom Layer w0.508: v1(49.86,38.32) 57.132,38.32 57.352,38.1 v1@57.393,38.1 ; v1(62.992,38.1) 68.326,43.434 70.647,43.434 ; R14.1 70.647,44.177 70.647,43.434 ; 70.641,43.293 70.641,42.389 R13.1 ; J11.1 79.824,43.434 70.647,43.434
pads on no net: BOOT.1 BOOT.2 EN.1 EN.2 J2.2 J2.3 J2.4 J9.5 S0.1 U2.4 U2.5 U2.6 U2.7 U2.14 U2.17 U2.18 U2.19 U2.20 U2.21 U2.22 U2.32 U3.1 U3.2 U3.9 U3.10 U3.11 U3.12 U3.13 U3.14 U3.15 U3.16 U3.17 U3.18 U3.19 U3.20 U3.21 U3.22 U3.23 U3.27 U4.7 U4.8 U4.11 U4.12 USB.4 USB.SH1 USB.SH2 USB.SH3 USB.SH4 USB.SH5 USB.SH6 USB.SH7 USB.SH8
copper on no net: | length 26.8
  Top Layer w0.254: v1(60.579,15.282) 60.621,15.282 61.207,15.868 61.314,15.975 61.459,15.975 62.551,15.975 ; v1(60.579,18.584) 61.188,17.975 62.551,17.975 ; v1@61.345,19.342 61.345,19.326 62.196,18.475 62.551,18.475 ; v1(62.23,13.25) 62.315,13.335 62.569,13.335 63.418,14.184 63.418,14.602 63.421,14.605 ; v1(62.992,12.488) 63.921,13.417 63.921,14.605 ; 67.291,15.975 68.649,15.975 v1(69.469,15.155) ; 67.291,16.475 69.322,16.475 69.673,16.475 v1(70.104,16.044) ; 67.291,16.975 67.294,16.978 v1@70.866,16.978 ; 67.291,17.475 69.732,17.475 v1@70.079,17.822 ; 67.291,17.975 68.606,17.975 v1(69.342,18.711) ; 67.291,18.475 67.963,18.475 68.444,18.956 v1@68.444,19.464
  other v1: 70.866,16.933 48,17 50,17 52,17 54,17 56,17 70.104,17.822 48,19 50,19 52,19 54,19 56,19 61.341,19.346 68.453,19.473 48,21 50,21 52,21 54,21 56,21 46,25 48,25 50,25 52,25 54,25 44,27 46,27 48,27 50,27 52,27 54,27 44,29 46,29 48,29 50,29 52,29 54,29 86.703,45.436 88.703,45.436 86.703,47.436 88.703,47.436 86.703,49.436 88.703,49.436 86.703,51.436 88.703,51.436 86.703,53.436 88.703,53.436 86.703,55.436 88.703,55.436 10,61 12,61 14,61 16,61 18,61 20,61 22,61 24,61 26,61 10,63 12,63 14,63 16,63 18,63 20,63 22,63 24,63 26,63 10,65 12,65 14,65 16,65 18,65 20,65 22,65 24,65 26,65 10,67 12,67 14,67 16,67 18,67 20,67 22,67 24,67 26,67 10,69 12,69 14,69 16,69 18,69 20,69 22,69 24,69 26,69 10,71 12,71 14,71 16,71 18,71 20,71 22,71 24,71 26,71 18,77 20,77 22,77 24,77 26,77 28,77 30,77 32,77 18,79 20,79 22,79 24,79 26,79 28,79 30,79 32,79 18,81 20,81 22,81 24,81 26,81 28,81 30,81 32,81 18,83 20,83 22,83 24,83 26,83 28,83 30,83 32,83 18,85 20,85 22,85 24,85 26,85 28,85 30,85 32,85
  other v2: 86,11 88,11 86,13 88,13 86,15 88,15 86,17 88,17 86,23 88,23 86,25 88,25 86,27 88,27 86,29 88,29 76,79 78,79 80,79 82,79 84,79 86,79 88,79 76,81 78,81 80,81 82,81 84,81 86,81 88,81 76,83 78,83 80,83 82,83 84,83 86,83 88,83 76,85 78,85 80,85 82,85 76,87 78,87 80,87 82,87 76,89 78,89 80,89 82,89 84,89

## Polygon pours and split planes (outlines as drawn)
GND on Top Layer "GND_L01_P003" (solid, remove dead copper, pour order 3): 0,0 90,0 90,90 0,90
GND on Top Layer "NONET_L01_P001" (solid, remove dead copper, shelved, pour order 1): 0,0 90,0 90,90 0,90
GND on Bottom Layer "GND_L02_P002" (solid, remove dead copper, pour order 2): 0,0 90,0 90,90 0,90
GND on Bottom Layer "NONET_L02_P000" (solid, remove dead copper, shelved, pour order 0): 0,0 90,0 90,90 0,90

## Keep-outs
Keep-Out Layer:
  the board outline again, w0.254

## Other copper
Top Layer:
  pour cut-out: 35.62,56.92 35.62,38.82 55.54,38.82 55.54,39.19 55.45,39.28 55.45,56.8 55.51,56.86

## Silkscreen, mask and mechanical layers (free items; w line width, h text height)
Top Overlay:
  lines w0.127: 54.9,71.3 54.9,86.7 ; 71.1,71.3 71.1,86.7
  lines w0.2: 60.071,59.351 62.865,59.351 ; 60.071,64.643 70.231,64.643
  lines w0.254: 7,48.5 33.5,48.5 33.5,88.5 7,88.5 7,48.5
  text "GPS" at 16.383,72.136 h1.52
  text "5V" at 42.799,66.099 h1.52
  text "G" at 45.593,66.057 h1.52
  text "SCL" at 47.498,65.972 h1.52
  text "SDA" at 50.419,65.972 h1.52
  text "MO" at 57.658,60.723 h1.52
  text "SC" at 62.865,60.723 h1.52
  text "NS" at 65.532,60.723 h1.52
  text "RS" at 68.072,60.723 h1.52
  text "MI" at 60.706,60.706 h1.52
  text "Vehicle Monitoring System" at 4.045,54.229 h1.2 r90
  text "5V" at 85.437,53.086 h1.52 r90
  text "Trig" at 85.437,50.165 h1.52 r90
  text "Echo" at 85.455,47.117 h1.52 r90
  text "G" at 21.082,47.007 h1.52
  text "5V" at 23.368,47.007 h1.52
  text "RX1" at 14.478,46.99 h1.52
  text "TX1" at 17.78,46.99 h1.52
  text "G" at 85.454,45.593 h1.52 r90
  text "3.3V" at 2.045,44.746 h1.2 r270
  text "Vol" at 85.455,42.8 h1.52 r90
  text "G" at 2.127,41.51 h1.52 r270
  text "Vin" at 87.249,37.72 h1.52 r90
  text "G" at 87.486,34.544 h1.52 r90
  text "G" at 85.2,31.242 h1.52 r90
  text "DS" at 85.2,28.321 h1.52 r90
  text "3.3V" at 85.187,25.019 h1.52 r90
  text "G" at 7.874,0.567 h1.52
  text "5V" at 11.303,0.567 h1.52

## Text inside footprints (layer, text, board x,y; h text height)
C1: Top Overlay "+" at 11.947,30.267 h0.89 r180
C2: Top Overlay "+" at 38.845,29.886 h0.89 r180
U1: Top Overlay "1" at 16.437,22.149 h1
U2: Top Overlay "www.EvertDekker.com" at 41.148,63.373 h0.5
USB: Mechanical 1 "PCB EDGE" at 67.709,1.95 h0.8 r180